# Altium PCB PCB1.PcbDoc
Units mm, origin at the board's own origin, x right, y up, seen from the top; angles counter-clockwise.
Board outline 74.98 x 34 mm, 2 copper layers (Top Layer, Bottom Layer), stack 1.55 mm thick; 69 components, 50 nets, 257 pads, 55 vias.
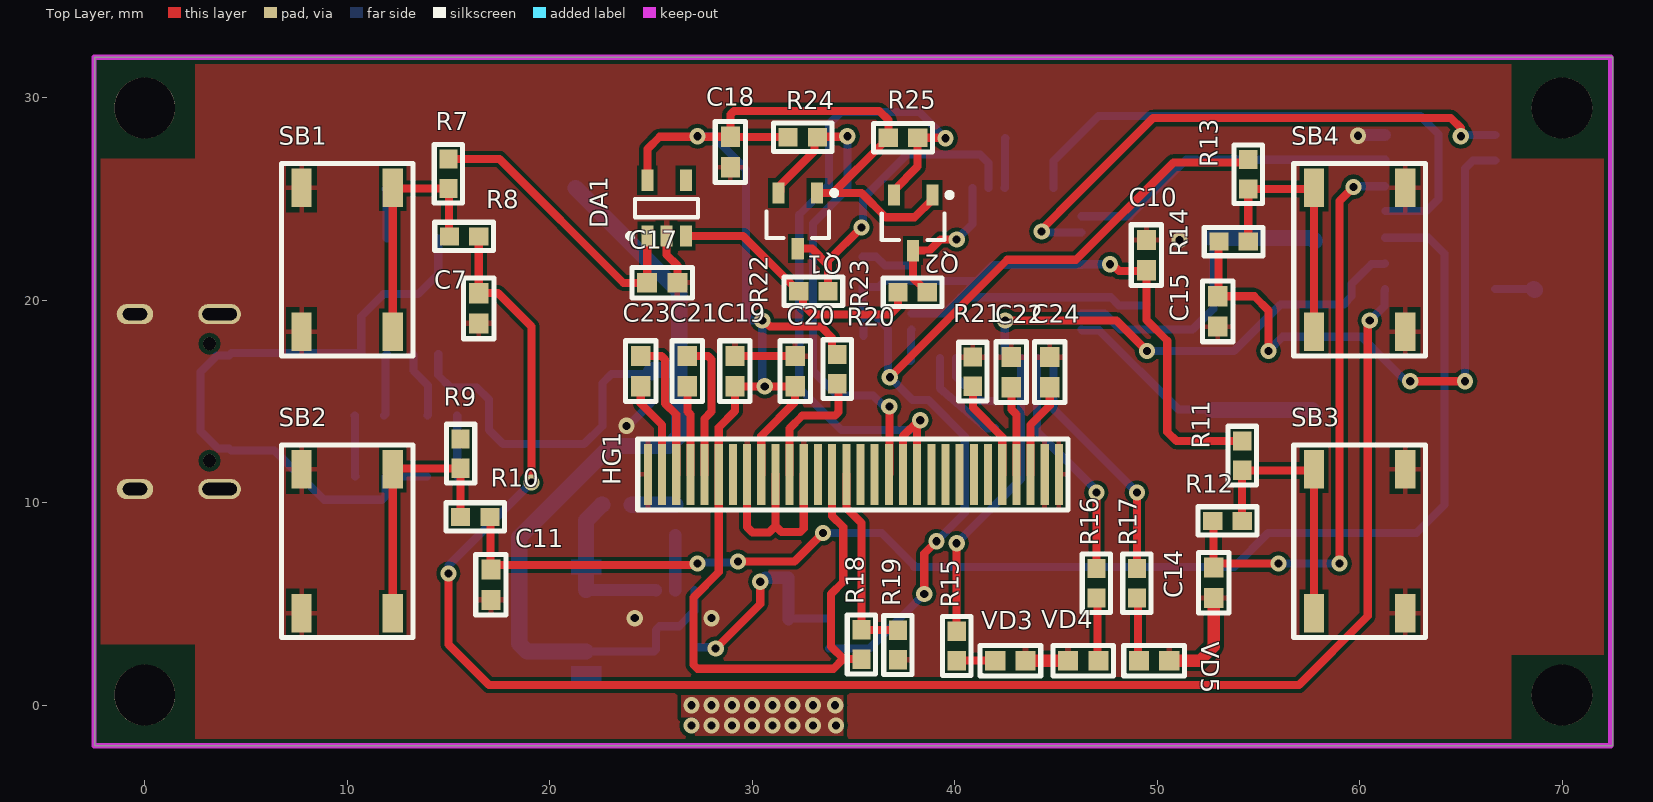
[diagram p0: Top Layer view]
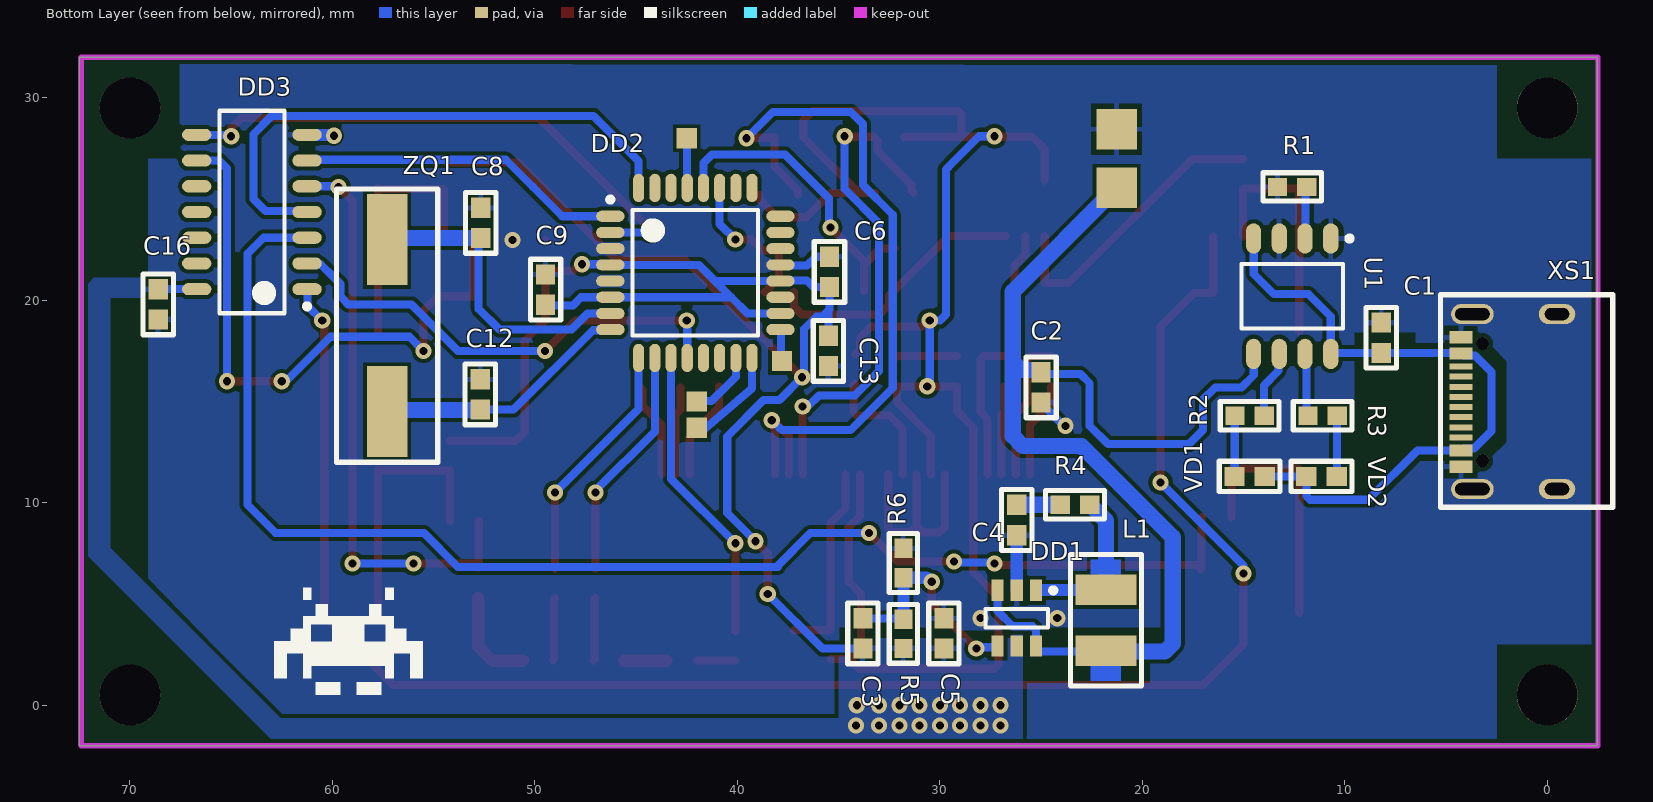
[diagram p1: Bottom Layer view, seen from below]
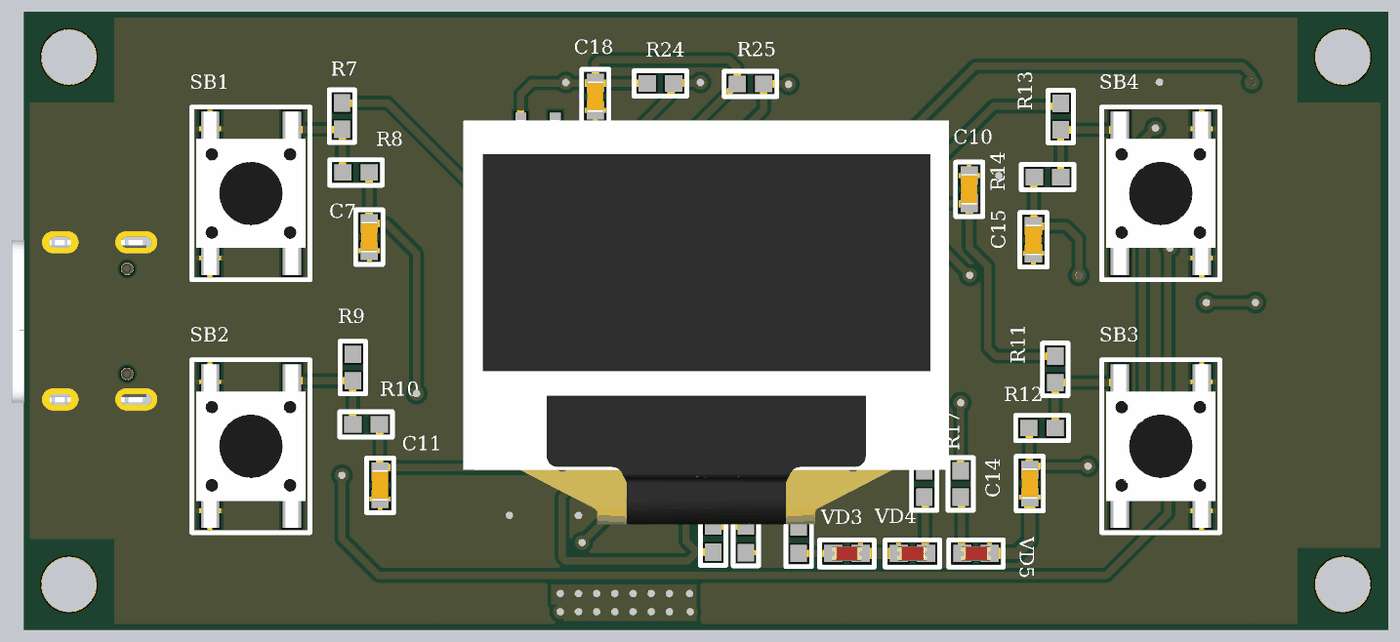
[diagram p2: 3D render of the assembled board from above, using the file's embedded part models]
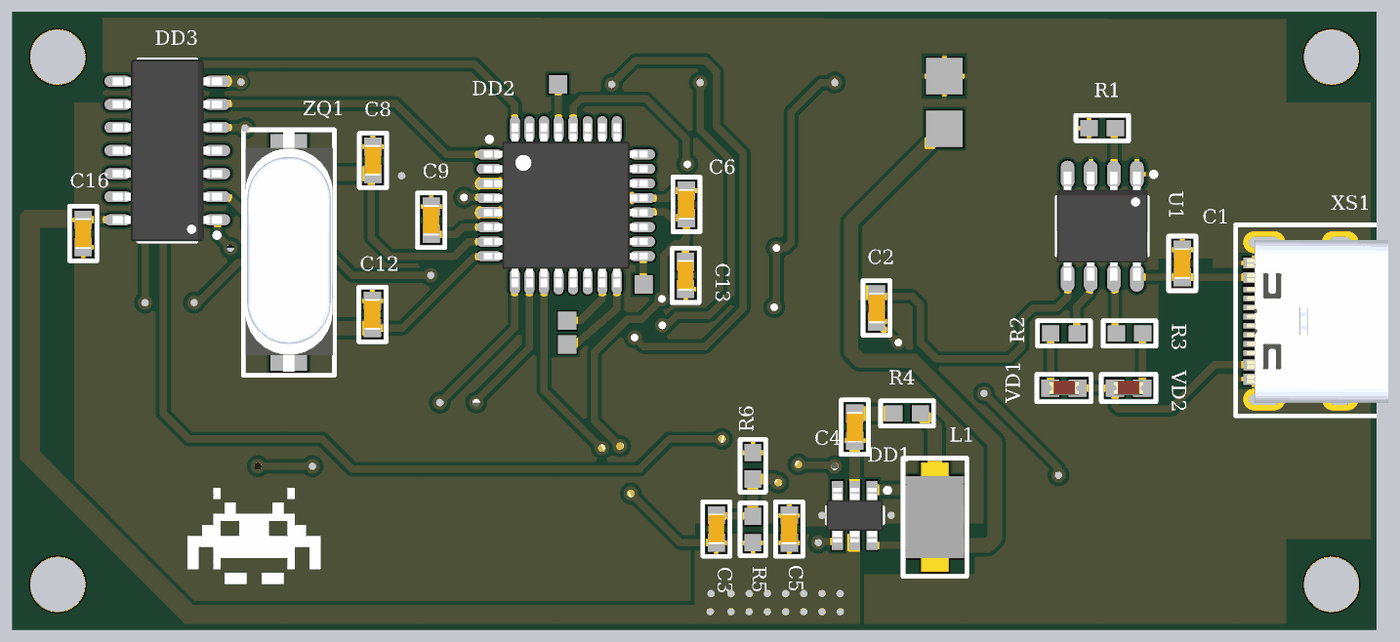
[diagram p3: 3D render of the assembled board from below, using the file's embedded part models]

## Layer stack, top to bottom
Top Solder: solder mask 0.0254, SM-002, Dk 4
Top Layer: signal copper 0.35
Dielectric 1: dielectric 0.85, FR-4, Dk 4.8
Bottom Layer: signal copper 0.35
Bottom Solder: solder mask 0.0254, SM-002, Dk 4

## Board outline
-2.475,-2 72.5,-2 72.5,32 -2.475,32

## Design rules (kind name [scope] priority, off if disabled: settings)
Clearance [All] p1: gap=0.2 ignorepadtopadclearanceinfootprint=FALSE except(0.1: SMDPad-SMDPad SMDPad-THPad THPad-THPad)
PlaneClearance [All] p1: clearance=0.5
PlaneConnect [All] p1: planeconnectstyle=Direct reliefexpansion=0.508 reliefentries=4 reliefconductorwidth=0.254 reliefairgap=0.254
PolygonConnect [All] p1: connectstyle=Direct reliefconductorwidth=0.254 reliefentries=4 polygonreliefangle="90 Angle" airgapwidth=0.254
RoutingVias [All] p1: holewidth=0.6 width=1 viastyle="Through Hole" minholewidth=0.4 minwidth=0.7 maxholewidth=0.711 maxwidth=1.27
SolderMaskExpansion [All] p1: expansion=0.102 istentingtop=FALSE
UnpouredPolygon [All] p1: allowunpoured=TRUE allowshelved=TRUE
Width [All] p1: maxlimit=0.8 minlimit=0.254 preferedwidth=0.4
27 further rules are at their usual default settings.

## Classes and differential pairs
component class ControlBlock: C6 C7 C8 C9 C10 C11 C12 C13 C14 C15 C16 C17 C18 C19 C20 C21 C22 C23 C24 DA1 DD2 DD3 HG1 Q1 Q2 R7 R8 R9 R10 R11 R12 R13 R14 R15 R16 R17 R18 R19 R20 R21 R22 R23 R24 R25 SB1 SB2 SB3 SB4 VD3 VD4 VD5 Z1 ZQ1
component class Sheet1: C1 C2 C3 C4 C5 DD1 L1 R1 R2 R3 R4 R5 R6 U1 VD1 VD2 XS1

## Components (designator, comment, footprint, x,y, rotation, side; value= is the part's Value field where it differs from the comment)
C1 "0.1uF" "Cap 0603" 8.2,18.15 r270 bottom
C2 "10uF" "Cap 0603" 25,15.7 r90 bottom
C3 "3.6pF" "Cap 0603" 33.8,3.55 r270 bottom
C4 "1nF" "Cap 0603" 26.2,9.15 r270 bottom
C5 "10uF" "Cap 0603" 29.8,3.55 r90 bottom
C6 "0.1uF" "Cap 0603" 35.45,21.4 r270 bottom
C7 "0.1uF" "Cap 0603" 16.5,19.6 r90 top locked
C8 "15pF" "Cap 0603" 52.673,23.825 r270 bottom
C9 "0.1uF" "Cap 0603" 49.475,20.527 r270 bottom
C10 "0.1uF" "Cap 0603" 49.475,22.227 r270 top
C11 "0.1uF" "Cap 0603" 17.1,5.95 r90 top locked
C12 "15pF" "Cap 0603" 52.7,15.35 r270 bottom
C13 "0.1uF" "Cap 0603" 35.5,17.5 r90 bottom
C14 "0.1uF" "Cap 0603" 52.8,6.05 r90 top locked
C15 "0.1uF" "Cap 0603" 53,19.45 r90 top locked
C16 "0.1uF" "Cap 0603" 68.6,19.8 r90 bottom
C17 "1uF" "Cap 0603" 25.562,20.863 r180 top
C18 "2.2uF" "Cap 0603" 28.925,27.325 r90 top
C19 "2.2uF" "Cap 0603" 29.15,16.5 r270 top
C20 "2.2uF" "Cap 0603" 32.125,16.5 r270 top
C21 "2.2uF" "Cap 0603" 26.8,16.5 r90 top
C22 "2.2uF" "Cap 0603" 42.8,16.45 r270 top
C23 "2.2uF" "Cap 0603" 24.5,16.5 r270 top
C24 "2.2uF" "Cap 0603" 44.7,16.45 r270 top
DA1 "AP2112K-3.3TRG1" SOT23-5 25.775,24.55 r90 top
DD1 "TPS61070DDCR" SOT23-6 26.2,4.3 r270 bottom (schematic designator DD?)
DD2 "ATMEGA328P" TQFP32 42.075,21.35 r180 bottom locked
DD3 "74AHC14D.112" SOIC14 63.975,24.36 r0 bottom
HG1 "ssd1306-0.96" SSD1306_0.96_I2C 35,11.4 r0 top locked
L1 "LQH43MN4R7K" LQH43M 21.8,4.2 r90 bottom
Q1 "BSS138" SOT23 32.25,23.925 r270 top
Q2 "BSS138" SOT23 37.95,23.825 r270 top
R1 "5k" "Resistor 0603" 12.6,25.6 r180 bottom
R2 "1k" "Resistor 0603" 14.7,14.3 r0 bottom
R3 "1k" "Resistor 0603" 11.1,14.3 r180 bottom
R4 "5.1" "Resistor 0603" 23.325,9.9 r0 bottom
R5 "820k" "Resistor 0603" 31.8,3.525 r90 bottom
R6 "91k" "Resistor 0603" 31.8,7.025 r90 bottom
R7 "10k" "Resistor 0603" 15,26.25 r270 top locked
R8 "100k" "Resistor 0603" 15.775,23.15 r0 top locked
R9 "10k" "Resistor 0603" 15.6,12.425 r270 top locked
R10 "100k" "Resistor 0603" 16.325,9.3 r0 top locked
R11 "10k" "Resistor 0603" 54.2,12.325 r270 top locked
R12 "100k" "Resistor 0603" 53.475,9.1 r180 top locked
R13 "10k" "Resistor 0603" 54.5,26.225 r270 top locked
R14 "100k" "Resistor 0603" 53.775,22.9 r180 top locked
R15 "180" "Resistor 0603" 40.1,2.925 r90 top
R16 "180" "Resistor 0603" 47,6.025 r90 top
R17 "180" "Resistor 0603" 49,6.025 r90 top
R18 "0*" "Resistor 0603" 35.4,3 r90 top
R19 "0*" "Resistor 0603" 37.2,2.975 r270 top
R20 "10k" "Resistor 0603" 34.2,16.6 r90 top
R21 "390" "Resistor 0603" 40.9,16.475 r270 top
R22 "10k" "Resistor 0603" 33.025,20.45 r180 top
R23 "10k" "Resistor 0603" 37.925,20.4 r180 top
R24 "10k" "Resistor 0603" 32.5,28.05 r180 top
R25 "10k" "Resistor 0603" 37.45,28.025 r180 top
SB1 "Button" Button_6x6 10,22 r90 top locked
SB2 "Button" Button_6x6 10,8.1 r90 top locked
SB3 "Button" Button_6x6 60,8.1 r270 top locked
SB4 "Button" Button_6x6 60,22 r270 top locked
U1 "TP4056" SOP8 12.6,20.2 r270 bottom
VD1 "LED 0603" VD0603 14.7,11.3 r0 bottom
VD2 "LED 0603" VD0603 11.15,11.3 r180 bottom
VD3 "LED_3" VD0603 42.75,2.2 r0 top
VD4 "LED_2" VD0603 46.35,2.2 r180 top
VD5 "LED_1" VD0603 49.85,2.2 r0 top
XS1 "USB C" "USB C 16" 1.895,14.996 r90 bottom
ZQ1 "HC-49SM" HC-49SM 57.3,18.75 r270 bottom

## Footprints (in the part's own frame and the unit in brackets; to place one, negate y for a bottom-side part, rotate by r counter-clockwise, add the part's x,y. Pads: shape width x height; smd on the part's side, far side on the other; paste and mask are expansions set on the pad)
Button_6x6 [mm]
  rect 1.9x1 smd paste+0: 1(-3.55,2.25) 1(3.55,2.25) 2(-3.55,-2.25) 2(3.55,-2.25)
  silkscreen extent -4.75,-3.25 4.75,3.25, body extent -4.5,-3 4.5,3, height 4.3
"Cap 0603" [mm]
  rect 1x0.95 smd: 1(-0.75,0) 2(0.75,0)
  silkscreen extent -1.5,-0.75 1.5,0.75, body extent -0.85,-0.45 0.85,0.45, height 0.8
HC-49SM [mm]
  rect 4.5x2 smd paste+0: 1(-4.25,0) 2(4.25,0)
  silkscreen extent -6.75,-2.5 6.75,2.5, body extent -6.65,-2.39 6.55,2.41, height 4.3
LQH43M [mm]
  rect 1.5x3 smd paste+0: 1(-1.5,0) 2(1.5,0)
  Top Layer region: 3,-0.75 2.25,-0.75 2.25,0.75 3,0.75
  Top Layer region: -3,0.75 -2.25,0.75 -2.25,-0.75 -3,-0.75
  silkscreen extent -3.25,-1.75 3.25,1.75, body extent -2.25,-1.6 2.25,1.6, height 2.8
"Resistor 0603" [mm]
  rect 0.95x0.9 smd: 1(-0.725,0) 2(0.725,0)
  silkscreen extent -1.45,-0.7 1.45,0.7, body extent -0.85,-0.45 0.85,0.45, height 0.55
SOIC14 [mm] "SOIC, 14-Leads, Body 9,90x3,90mm, Pitch 1,27mm, IPC Medium Density"
  oval 1.45x0.6 smd: 1(-2.725,3.81) 2(-2.725,2.54) 3(-2.725,1.27) 4(-2.725,0) 5(-2.725,-1.27) 6(-2.725,-2.54) 7(-2.725,-3.81) 8(2.725,-3.81) 9(2.725,-2.54) 10(2.725,-1.27) 11(2.725,0) 12(2.725,1.27) 13(2.725,2.54) 14(2.725,3.81)
  silkscreen extent -2.85,-5 1.6,5, body extent -3,-5 3,5, height 1.75
SOP8 [mm] "TSOP, 8-Leads, Body 4,90x3,90mm, Pitch 1,27mm, IPC Medium Density"
  oval 1.5x0.75 smd: 1(-2.85,1.905) 2(-2.85,0.635) 3(-2.85,-0.635) 4(-2.85,-1.905) 5(2.85,-1.905) 6(2.85,-0.635) 7(2.85,0.635) 8(2.85,1.905)
  silkscreen extent -2.97,-2.5 1.6,2.95, body extent -3,-2.5 3,2.5, height 1.3
SOT23 [mm]
  rect 1.05x0.6 smd: 1(-1.375,0.95) 2(-1.375,-0.95) 3(1.375,0)
  silkscreen extent -1.5,-1.55 0.85,1.93, body extent -1.5,-1.55 1.5,1.55, height 1.3
SOT23-5 [mm]
  rect 1.05x0.6 smd: 1(-1.375,0.95) 2(-1.375,0) 3(-1.375,-0.95) 4(1.375,-0.95) 5(1.375,0.95)
  silkscreen extent -1.5,-1.55 0.45,1.92, body extent -1.5,-1.55 1.5,1.55, height 1.3
SOT23-6 [mm] "SOT23, 6-Leads, Body 3,00x2,85mm, Pitch 0,95mm, IPC Medium Density"
  rect 1.05x0.6 smd: 1(-1.375,0.95) 2(-1.375,0) 3(-1.375,-0.95) 4(1.375,-0.95) 5(1.375,0) 6(1.375,0.95)
  silkscreen extent -1.5,-1.55 0.45,1.92, body extent -1.5,-1.55 1.5,1.55, height 1.3
SSD1306_0.96_I2C [mm]
  rect 0.4x3 smd paste+0: 1(-10.15,0) 2(-9.45,0) 3(-8.75,0) 4(-8.05,0) 5(-7.35,0) 6(-6.65,0) 7(-5.95,0) 8(-5.25,0) 9(-4.55,0) 10(-3.85,0) 11(-3.15,0) 12(-2.45,0) 13(-1.75,0) 14(-1.05,0) 15(-0.35,0) 16(0.35,0) 17(1.05,0) 18(1.75,0) 19(2.45,0) 20(3.15,0) 21(3.85,0) 22(4.55,0) 23(5.25,0) 24(5.95,0) 25(6.65,0) 26(7.35,0) 27(8.05,0) 28(8.75,0) 29(9.45,0) 30(10.15,0)
  silkscreen extent -10.65,-1.75 10.6,1.75, body extent -13.33,-7.62 13.37,14.6, height 3.87
TQFP32 [mm]
  oval 1.4x0.55 smd: 1(-4.2,2.8) 2(-4.2,2) 3(-4.2,1.2) 4(-4.2,0.4) 5(-4.2,-0.4) 6(-4.2,-1.2) 7(-4.2,-2) 8(-4.2,-2.8) 17(4.2,-2.8) 18(4.2,-2) 19(4.2,-1.2) 20(4.2,-0.4) 21(4.2,0.4) 22(4.2,1.2) 23(4.2,2) 24(4.2,2.8)
  oval 0.55x1.4 smd: 9(-2.8,-4.2) 10(-2,-4.2) 11(-1.2,-4.2) 12(-0.4,-4.2) 13(0.4,-4.2) 14(1.2,-4.2) 15(2,-4.2) 16(2.8,-4.2) 25(2.8,4.2) 26(2,4.2) 27(1.2,4.2) 28(0.4,4.2) 29(-0.4,4.2) 30(-1.2,4.2) 31(-2,4.2) 32(-2.8,4.2)
  silkscreen extent -4.33,-3.1 3.1,3.75, body extent -4.5,-4.5 4.5,4.5, height 1.6
"USB C 16" [mm]
  round 0.65 hole 0.65: 0(-2.92,1.305) 0(2.86,1.305)
  rect 0.6x1.14 smd: 1(-3.22,2.375) 2(-2.42,2.375) 11(2.38,2.375) 12(3.18,2.375)
  rect 0.3x1.14 smd: 3(-1.77,2.375) 4(-1.27,2.375) 5(-0.77,2.375) 6(-0.27,2.375) 7(0.23,2.375) 8(0.73,2.375) 9(1.23,2.375) 10(1.73,2.375)
  oval 1x2.1 hole 0.6 slot 1.7 at 90 deg unplated: 13(-4.32,1.805) 14(4.32,1.805)
  oval 1x1.8 hole 0.6 slot 1.2 at 90 deg unplated: 15(-4.32,-2.375) 16(4.32,-2.375)
  silkscreen extent -5.22,-5.12 5.28,3.38, body extent -4.49,-5 4.45,2.75, height 3.26
VD0603 [mm]
  rect 1x0.95 smd: 1(-0.75,0) 2(0.75,0)
  silkscreen extent -1.5,-0.75 1.5,0.75, body extent -0.81,-0.4 0.81,0.4, height 0.6

## Part data
C1 C2 C3 C4 C5 C6 C7 C8 C9 C10 C11 C12 C13 C14 C15 C16 C17 C18 C19 C20 C21 C22 C23 C24: library part Capacitor
DA1: library part Linear_stabilizer_3.3
HG1: library part OLED_0.96
L1: library part Inductor
Q1 Q2: library part "N-Channel MOSFET"
R1 R2 R3 R4 R5 R6 R7 R8 R9 R10 R11 R12 R13 R14 R15 R16 R17 R18 R19 R20 R21 R22 R23 R24 R25: library part Resistor, "SMD 0402-0805"
VD3 VD4 VD5: library part LED
XS1: library part "USB C 16"

## Free pads (board coordinates)
  round 3 hole 3 paste+0 mask+0.102: 2(0,0.5) 2(0,29.5) 2(70,0.5) 2(70,29.5)
  rect 1x1 smd far side paste+0 mask+0.102: 3(42.5,28) 4(42,15) 5(42,13.7) 6(37.8,17)
  rect 2x2 smd far side paste+0 mask+0.102: 7(21.275,25.55) 8(21.275,28.45)

## Via types
v1: diameter 0.8, hole 0.4, Top Layer to Bottom Layer, tented both sides, 55 vias

## Nets (pads, with @x,y where several pads share a name; then routed paths per layer and width w, separated by ;. In a path a pad name is that pad's centre, name@x,y a point inside that pad or via, vN(x,y) a via of type N, cw(c..) or ccw(c..) an arc to the next point about the centre after c; other vN are vias at no path point)
+3.3: C18.2 C19.2 C20.2 DA1.5 HG1.6 HG1.9 HG1.14 Q1.1 Q2.1 R18.1 R20.2 R24.2 R25.2 | length 89.7
  Top Layer w0.4: DA1.5 24.825,27.466 25.434,28.075 C18.2 ; HG1.9 30.45,13.3 32.125,14.975 C20.2 v1(30.625,15.75) C19.2 29.15,14.525 28.35,13.725 HG1.6 28.35,6.574 27.1,5.324 27.1,2 27.3,1.8 32.713,1.8 34.017,1.8 34.492,2.275 ; v1(30.5,19) 30.576,19 30.876,18.7 33.4,18.7 33.95,18.15 33.95,17.575 R20.2 ; R24.2 31.762,28.062 28.938,28.062 C18.2 ; Q1.1 34,25.3 ; HG1.14 33.95,9.35 34.5,8.8 34.5,6.1 33.9,5.5 33.9,2.9 34.525,2.275 R18.1 ; Q2.1 38.9,24.975 38.025,24.1 36.6,24.1 35.4,25.3 34,25.3 ; C18.2 28.925,29.174 29.101,29.35 36.275,29.35 36.725,28.9 R25.2 36.7,28.025 36.45,27.775 36.45,27.75 34,25.3
  Bottom Layer w0.4: v1(27.3,28.1) 28.066,28.1 29.366,26.8 29.7,26.466 29.7,19.3 30,19 v1(30.5,19) 30.5,15.875 v1(30.625,15.75)
+5: C3.2 C5.1 C6.2 C9.2 C10.2 C13.2 C16.2 C17.2 DA1.1 DA1.3 DD1.5 DD2.4 DD2.6 DD2.18 DD2.20 DD3.14 R5.1 R7.1 R9.1 R11.1 R13.1 R22.2 R23.2 | length 118
  Top Layer w0.4: R7.1 17.525,26.975 23.637,20.863 C17.2 24.819,20.869 24.819,23.169 DA1.1 ; DA1.3 29.55,23.175 32.275,20.45 R22.2 32.52,20.23 32.52,19.78 33,19.3 36.8,19.3 37.2,19.7 R23.2 ; v1(36.8,16.2) 42.6,22 46,22 50.8,26.8 54.35,26.8 R13.1 ; v1(38.5,5.5) 38.5,7.5 v1(39.1,8.1) ; v1(47.675,21.777) 47.702,21.75 47.822,21.75 48.122,21.45 C10.2@49.475,21.45 ; C10.2 C10.2@49.475,21.45 ; R11.1 50.95,13.05 50.5,13.5 50.5,18 49.475,19.025 C10.2@49.475,21.45
  Bottom Layer w0.4: C3.2 35.8,2.8 v1(38.5,5.5) ; C13.2 35.5,19.5 ; DD2.18 39.5,19.35 40.3,20.15 ; v1(39.1,8.1) 40.5,9.5 40.5,13.275 38.701,15.074 37.926,15.074 v1(36.8,16.2) 36.7,16.3 36.7,18.591 36.083,19.208 35.792,19.208 35.5,19.5 ; DD2.6@46.122,20.15 47.722,20.15 48.122,19.75 49.448,19.75 C9.2 ; DD2.6 40.3,20.15 ; DD2.4 41.9,21.75 41.1,20.95 ; DD2.4@46.375,21.777 v1(47.675,21.777) ; DD3.14 C16.2 ; 35.5,19.5 35.45,19.55 C6.2 36.25,20.65 36.575,20.975 37.85,20.975 DD2.20 41.1,20.95 ; 40.3,20.15 41.1,20.95
  Bottom Layer w0.8: C16.2 C16.2@68.65,20.5
  other v1: 27,-1 28,-1 29,-1 30,-1 31,-1 32,-1 33,-1 34.143,-1 27,0 28,0 29,0 30,0 31,0 32,0 33,0 34.1,0
+5Charge: C1.2 U1.4 U1.8 VD1.1 VD2.1 XS1.2 XS1.11 | length 33.2
  Bottom Layer w0.4: VD1.1 VD2.1 11.9,10.326 11.724,10.15 8.85,10.15 6.42,12.58 4.275,12.58 4.175,12.68 3.62,12.68 2.759,13.541 2.759,16.459 3.58,17.28 4.175,17.28 4.275,17.38 4.285,17.39 8.19,17.39 C1.2 10.645,17.4 U1.8 10.695,19.195 11.8,20.3 13.5,20.3 14.5,21.3 14.5,23.045 U1.4
Battery_OUT+: C2.2 DD1.3 DD1.6 L1.1 pad.7 U1.5 | length 58.7
  Bottom Layer w0.4: U1.5 14.5,17.345 14.5,16.3 15.1,15.7 16.4,15.7 17,15.1 17,13.6 17.7,12.9 21.7,12.9 22.6,13.8 22.6,15.9 23.05,16.35 C2.2@24.8,16.35 ; L1.1@21.8,2.65 25.15,2.65 DD1.6@25.2,2.7 ; DD1.6@25.25,2.75 25.25,3.724 25.426,3.9 26.4,3.9 27.15,4.65 DD1.3 DD1.3@27.162,5.687
  Bottom Layer w0.8: pad.7 26.4,20.425 26.4,16.969 ; L1.1@21.8,2.65 18.893,2.65 18.5,3.043 18.5,8.3 23,12.8 25.9,12.8 26.4,13.3 26.4,16.969 ; C2.2 25,16.475 25.075,16.55 25.981,16.55 26.4,16.969
Button_1: DD2.12 DD3.2 | length 23.4
  Top Layer w0.4: v1(42.5,19) 48,19 v1(49.5,17.5)
  Bottom Layer w0.4: DD2.12 42.475,18.975 v1(42.5,19) ; v1(49.5,17.5) 53.8,17.5 56.1,19.8 59.224,19.8 59.4,19.976 59.4,20 59.6,20.2 59.6,20.8 59.9,21.1 60.582,21.782 61.212,21.782 DD3.2
Button_2: DD2.32 DD3.4 | length 27.7
  Bottom Layer w0.4: DD2.32 44.875,26.875 47.1,29.1 63,29.1 63.9,28.2 63.9,25 63.3,24.4 DD3.4@61.275,24.4
Button_3: DD2.1 DD3.6 | length 16.2
  Bottom Layer w0.4: DD2.1 48.65,24.15 50.107,25.607 51.44,26.94 DD3.6@61.275,26.94
Button_4: DD2.2 DD3.8 | length 27.3
  Top Layer w0.4: v1(44.3,23.4) 44.3,23.5 46,25.2 49.8,29 64.5,29 65,28.5 v1@65,28.2
  Bottom Layer w0.4: v1(44.3,23.4) 44.35,23.35 DD2.2 ; v1@64.975,28.16 64.985,28.17 DD3.8
  other v1: 65,28.1
GND: C1.1 C2.1 C4.2 C5.2 C6.1 C7.1 C8.1 C9.1 C10.1 C11.1 C12.1 C13.1 C14.1 C15.1 C16.1 C17.1 C18.1 C19.1 C20.1 C22.1 C24.1 DA1.2 DD1.2 DD2.3 DD2.5 DD2.21 DD3.7 HG1.1 HG1.8 HG1.10 HG1.12 HG1.29 HG1.30 pad.8 R1.1 R6.2 R19.2 R21.1 SB1.1 SB2.1 SB3.1 SB4.1 U1.1 U1.3 VD3.2 VD4.2 VD5.2 XS1.1 XS1.12 XS1.13 XS1.14 XS1.15 XS1.16 | length 32.1
  Top Layer w0.4: DA1.2 25.775,22.25 26.312,21.713 C17.1 ; C19.1 C20.1 C20.1@32.213,17.162 ; HG1.8 29.75,8.8 30.025,8.525 30.825,8.525 31.15,8.85 ; HG1.10 31.15,8.85 ; HG1.12 32.55,8.726 32.374,8.55 31.45,8.55 31.15,8.85 ; C10.1@49.448,22.95 C10.1
  Top Layer w0.6: VD3.2 VD4.2 ; VD5.2 52.1,2.2 52.8,2.9 C14.1
  Bottom Layer w0.4: v1(23.8,13.8) 23.875,13.8 25,14.925 C2.1 ; C6.1 36.125,22.15 36.554,21.721 37.846,21.721 DD2.21
  Bottom Layer w0.6: DD1.2 C4.2 ; v1(59.925,28.125) 59.985,28.125 60.03,28.17 DD3.7
  other v1: 24.2,4.3 28,4.3 51.1,22.975
I2C_ADR: HG1.15 R18.2 R19.1 | length 9.8
  Top Layer w0.4: HG1.15 34.65,9.75 35.4,9 R18.2 35.412,3.712 37.187,3.712 R19.1
MISO: DD2.16 pad.5 | length 5
  Bottom Layer w0.4: DD2.16 39.275,15.655 41.584,13.669 41.708,13.678 pad.5
MOSI: DD2.15 pad.4 | length 3.4
  Bottom Layer w0.4: DD2.15 40.075,16.225 40.5,15.8 41.276,15.024 41.976,15.024 pad.4
NetC3_1: C3.1 DD1.4 R5.2 R6.1 | length 10.9
  Top Layer w0.4: v1(28.2,2.8) 30.4,5 v1(30.4,6.1)
  Bottom Layer w0.4: DD1.4 27.212,2.863 28.137,2.863 v1(28.2,2.8) ; R5.2 31.825,4.275 33.775,4.275 C3.1
  Bottom Layer w0.6: v1(30.4,6.1) 30.454,6.1 30.654,6.3 R6.1 R5.2
NetC4_1: C4.1 R4.2 | length 2.1
  Bottom Layer w0.8: R4.2 C4.1
NetC7_2: C7.2 DD3.1 R8.2 | length 87.6
  Top Layer w0.4: v1(15,6.5) 15,3 17,1 57,1 60.4,4.4 60.4,18.9 v1(60.5,19) ; R8.2 C7.2 17.45,20.35 19.1,18.7 v1(19.1,11)
  Bottom Layer w0.4: v1(15,6.5) 15,6.9 v1(19.1,11) ; v1(60.5,19) 61.226,19.726 61.226,20.458 61.25,20.482 DD3.1
NetC8_2: C8.2 DD2.7 ZQ1.1 | length 16
  Bottom Layer w0.4: DD2.7 47.4,19.35 48.2,18.55 51.75,18.55 52.775,19.575 52.775,22.973 C8.2
  Bottom Layer w0.8: C8.2 52.678,23.08 57.645,23.08 ZQ1.1@57.8,22.925
NetC11_2: C11.2 DD3.3 R10.2 | length 67.9
  Top Layer w0.4: R10.2 17.075,9.275 C11.2@17.075,6.725 ; C11.2 C11.2@17.075,6.725 ; v1(27.3,7) 27.223,6.923 17.273,6.923 C11.2@17.075,6.725 ; v1@29.6,7.1 32.1,7.1 v1(33.5,8.5)
  Bottom Layer w0.4: v1(27.3,7) 27.35,7.05 29.25,7.05 v1(29.3,7.1) ; v1(33.5,8.5) 36.4,8.5 38,6.9 38,6.834 53.809,6.834 55.475,8.5 62.8,8.5 64.2,9.9 64.2,22.3 63.41,23.09 DD3.3
NetC12_2: C12.2 DD2.8 ZQ1.2 | length 13.3
  Bottom Layer w0.4: DD2.8 46.304,18.521 47.129,18.521 51.05,14.6 C12.2 52.72,14.58 C12.2@52.776,14.524
  Bottom Layer w0.8: C12.2@52.72,14.58 57.645,14.58 ZQ1.2@57.8,14.425
NetC14_2: C14.2 DD3.5 R12.2 | length 29.1
  Top Layer w0.4: R12.2 52.775,9.075 52.775,6.825 C14.2 53,7 v1(56,7) ; v1(59,7) 59,24.9 v1(59.7,25.6)
  Bottom Layer w0.4: v1(56,7) v1(59,7) ; v1(59.7,25.6) 59.73,25.63 DD3.5
NetC15_2: C15.2 DD3.9 R14.2 | length 30.6
  Top Layer w0.4: R14.2 53.025,22.875 53.025,20.225 C15.2 54.8,20.2 55.5,19.5 v1(55.5,17.5) ; v1(62.5,16) v1(65.2,16)
  Bottom Layer w0.4: v1(55.5,17.5) 56.2,18.2 60.1,18.2 62.3,16 v1(62.5,16) ; v1(65.2,16) 65.2,26.5 65.6,26.9 DD3.9
NetC21_1: C21.1 HG1.4 | length 4.4
  Top Layer w0.4: C21.1 26.8,14.5 26.95,14.35 HG1.4
NetC21_2: C21.2 HG1.5 | length 7.1
  Top Layer w0.4: C21.2 27.824,17.25 28,17.074 28,14.5 27.65,14.15 HG1.5
NetC22_2: C22.2 HG1.27 | length 4.4
  Top Layer w0.4: C22.2 42.8,14.6 43.05,14.35 HG1.27
NetC23_1: C23.1 HG1.3 | length 7.2
  Top Layer w0.4: C23.1 25.524,17.25 25.7,17.074 25.7,14.9 26.25,14.35 HG1.3
NetC23_2: C23.2 HG1.2 | length 4.8
  Top Layer w0.4: C23.2 24.5,14.9 25.55,13.85 HG1.2
NetC24_2: C24.2 HG1.28 | length 4.7
  Top Layer w0.4: HG1.28 43.75,13.85 44.7,14.8 44.7,15.6 C24.2@44.8,15.7
NetDD2_9: DD2.9 R17.2 | length 12.1
  Top Layer w0.4: R17.2 v1(49,10.5)
  Bottom Layer w0.4: DD2.9 44.875,14.625 v1(49,10.5)
NetDD2_10: DD2.10 R16.2 | length 11.6
  Top Layer w0.4: R16.2 v1(47,10.5)
  Bottom Layer w0.4: DD2.10 44.075,13.525 47,10.6 v1(47,10.5)
NetDD2_11: DD2.11 R15.2 | length 14.8
  Top Layer w0.4: R15.2 v1(40.1,8)
  Bottom Layer w0.4: v1(40.1,8) 43.275,11.175 DD2.11
NetDD?_1: DD1.1 L1.2 R4.1 | length 8
  Bottom Layer w0.6: L1.2 25.25,5.7 DD1.1
  Bottom Layer w0.8: L1.2 21.8,6.825 21.8,9.125 22.575,9.9 R4.1
NetHG1_11: HG1.11 R20.1 | length 6.4
  Top Layer w0.4: HG1.11 31.85,13.675 32.475,14.3 34.091,14.3 34.266,14.476 34.266,15.809 R20.1
NetHG1_26: HG1.26 R21.2 | length 5
  Top Layer w0.4: R21.2 40.9,14.7 42.35,13.25 HG1.26
NetR1_2: R1.2 U1.2 | length 2.5
  Bottom Layer w0.4: R1.2@11.9,25.5 11.933,25.468 11.933,23.083 U1.2
NetR2_1: R2.1 U1.6 | length 3.4
  Bottom Layer w0.4: U1.6 13.278,17.307 13.278,16.522 14,15.8 14,14.325 R2.1
NetR2_2: R2.2 VD1.2 | length 3
  Bottom Layer w0.4: R2.2 15.438,14.288 15.438,11.312 VD1.2
NetR3_1: R3.1 U1.7 | length 3.1
  Bottom Layer w0.4: R3.1 11.898,14.373 11.898,17.283 U1.7
NetR3_2: R3.2 VD2.2 | length 3
  Bottom Layer w0.4: R3.2 10.388,14.288 10.388,11.312 VD2.2
NetR7_2: R7.2 R8.1 SB1.2 | length 12.3
  Top Layer w0.4: SB1.2@12.25,18.45 12.25,25.55 12.275,25.525 R7.2 15.025,25.5 15.025,23.175 R8.1@15,23.15
NetR9_2: R9.2 R10.1 SB2.2 | length 12.9
  Top Layer w0.4: SB2.2@12.25,4.55 12.25,11.65 12.3,11.7 R9.2 R10.1
NetR11_2: R11.2 R12.1 SB3.2 | length 13.2
  Top Layer w0.4: R12.1 R11.2 57.7,11.6 57.75,11.65 SB3.2@57.75,4.55
NetR13_2: R13.2 R14.1 SB4.2 | length 13
  Top Layer w0.4: R14.1 R13.2 57.7,25.5 57.75,25.55 SB4.2@57.75,18.45
NetR15_1: R15.1 VD3.1 | length 1.9
  Top Layer w0.4: R15.1 VD3.1
NetR16_1: R16.1 VD4.1 | length 3.1
  Top Layer w0.4: R16.1 47.05,5.25 47.05,2.25 VD4.1
NetR17_1: R17.1 VD5.1 | length 3.1
  Top Layer w0.4: R17.1 49.05,5.25 49.05,2.25 VD5.1
RST: DD2.29 pad.3 | length 2.5
  Bottom Layer w0.4: DD2.29 42.487,25.562 42.487,27.987 pad.3
SCL: DD2.28 Q1.3 R22.1 | length 15.6
  Top Layer w0.4: Q1.3 32.95,22.55 33.75,21.75 ; R22.1 33.75,21.75 ; v1(35.4,23.6) 33.75,21.95 33.75,21.75
  Bottom Layer w0.4: v1(35.4,23.6) 35.475,23.675 35.475,25.025 37.65,27.2 41.25,27.2 41.675,26.775 DD2.28
SCL_3.3: HG1.18 Q1.2 R24.1 | length 25.2
  Top Layer w0.4: Q1.2 31.4,25.4 31.4,25.7 33.076,27.376 33.076,27.901 R24.1 33.25,28.075 34.675,28.075 v1(34.7,28.1) ; HG1.18 36.775,11.425 v1(36.775,14.75)
  Bottom Layer w0.4: v1(34.7,28.1) 34.7,25.5 33,23.8 33,16.5 34.2,15.3 35.975,15.3 36.525,14.75 v1(36.775,14.75)
SDA: DD2.27 Q2.3 R23.1 | length 7.6
  Top Layer w0.4: R23.1 38.625,20.4 38.375,20.65 38.375,20.675 37.95,21.1 Q2.3 38.75,22.45 39.3,23 v1(40.1,23)
  Bottom Layer w0.4: v1(40.1,23) 40.875,23.775 DD2.27
SDA_3.3: HG1.19 HG1.20 Q2.2 R25.1 | length 37.6
  Top Layer w0.4: Q2.2 37,25.425 38.175,26.6 R25.1 39.525,28.025 v1(39.55,28) ; HG1.19 37.45,13.2 ; 37.45,13.3 38.225,14.075 v1(38.3,14.075) 38.3,13.967 38.15,13.817 HG1.20
  Bottom Layer w0.4: v1(38.3,14.075) 37.907,13.682 37.809,13.584 34.416,13.584 32.325,15.675 32.325,24.225 33.8,25.7 33.8,28.7 34.4,29.3 38.25,29.3 v1(39.55,28)
SPI_SCK: DD2.17 pad.6 | length 1.6
  Bottom Layer w0.4: pad.6 37.837,17.037 37.837,18.513 DD2.17
pads on no net: DA1.4 DD2.13 DD2.14 DD2.19 DD2.22 DD2.23 DD2.24 DD2.25 DD2.26 DD2.30 DD2.31 DD3.10 DD3.11 DD3.12 DD3.13 HG1.7 HG1.13 HG1.16 HG1.17 HG1.21 HG1.22 HG1.23 HG1.24 HG1.25 XS1.0 XS1.3 XS1.4 XS1.5 XS1.6 XS1.7 XS1.8 XS1.9 XS1.10

## Polygon pours and split planes (outlines as drawn)
+5 on Bottom Layer "+5_L02_P002" (solid, pour order 2): 25.9,3.5 25.9,-1.5 35,-1.5 35,3.3 26.5,3.3 26.5,3.5
GND on Bottom Layer "GND_L02_P013" (solid, pour order 13): 67.55,31.7 9.525,31.6 9.525,9.5 10.5,9.5 14.5,5.5 17.738,5.5 17.738,3.85 34.969,3.85 34.969,-0.413 62.388,-0.413 62.475,-0.5 69.1,6.264 69.1,27 67.55,27
GND on Bottom Layer "GND_L02_P003" (solid, pour order 3): 25.9,5.2 25.9,3.7 30.7,3.7 30.7,5.2
+5 on Bottom Layer "+5_L02_P015" (solid, pour order 15): 34.999,-0.635 34.822,-1.7 63,-1.7 72.2,7.5 72.2,20.688 71.776,21.112 68.148,21.112 68.148,20.066 68.174,20.041 68.25,20.117 70.968,20.117 70.968,7.823 70.993,7.798 62.56,-0.635
+5 on Bottom Layer "+5_L02_P005" (solid, pour order 5): 25.908,-1.8 35,-1.8 35,0.5 25.908,0.5
GND on Bottom Layer "GND_L02_P006" (solid, pour order 6): -2.2,3 2.5,3 2.5,-1.7 25.875,-1.7 25.875,1.075 19.6,1.075 19.6,5.7 14.3,5.7 10.25,9.75 8.575,9.75 6.275,12.05 2.95,12.05 2,13 2,17 2.9,17.9 6.5,17.9 6.5,18.425 9.725,18.425 9.725,31.6 2.5,31.6 2.5,27 -2.2,27
GND on Top Layer "GND_L01_P012" (solid, pour order 12): -2.5,3 2.5,3 2.5,-2 67.5,-2 67.5,2.5 72.5,2.5 72.5,27 67.5,27 67.5,32 2.5,32 2.5,27 -2.5,27
+5 on Top Layer "+5_L01_P011" (solid, pour order 11): 26.5,0.5 34.5,0.5 34.5,-1.5 26.5,-1.5

## Keep-outs
Keep-Out Layer:
  lines w0.254: -2.5,-2 -2.5,32 72.4,32 72.4,-2 -2.5,-2

## Silkscreen, mask and mechanical layers (free items; w line width, h text height)
Bottom Overlay:
  region: 58.801,0.931 58.801,0.728 58.801,0.525 57.582,0.525 57.582,0.728 57.582,0.931 57.582,1.135 58.801,1.135
  region: 60.833,0.931 60.833,0.728 60.833,0.525 59.614,0.525 59.614,0.728 59.614,0.931 59.614,1.135 60.833,1.135
  region: 57.379,5.605 57.379,5.402 57.379,5.199 56.972,5.199 56.972,5.402 56.972,5.605 56.972,5.808 57.379,5.808
  region: 61.443,5.605 61.443,5.402 61.443,5.199 61.036,5.199 61.036,5.402 61.036,5.605 61.036,5.808 61.443,5.808
  region: 60.833,4.792 60.833,4.589 60.833,4.386 61.443,4.386 61.443,4.183 61.443,3.979 61.443,3.776 62.052,3.776 62.052,3.573 62.052,3.37 62.052,3.167 62.865,3.167 62.865,2.963 62.865,2.76 62.865,2.557 62.865,2.354 62.865,2.151 62.865,1.947 62.865,1.744 62.865,1.541 62.865,1.338 62.256,1.338 62.256,1.541 62.256,1.744 62.256,1.947 62.256,2.151 62.256,2.354 62.256,2.557 61.443,2.557 61.443,2.354 61.443,2.151 61.443,1.947 61.443,1.744 61.443,1.541 61.443,1.338 61.036,1.338 61.036,1.541 61.036,1.744 61.036,1.947 57.379,1.947 57.379,1.744 57.379,1.541 57.379,1.338 56.972,1.338 56.972,1.541 56.972,1.744 56.972,1.947 56.972,2.151 56.972,2.354 56.972,2.557 56.16,2.557 56.16,2.354 56.16,2.151 56.16,1.947 56.16,1.744 56.16,1.541 56.16,1.338 55.55,1.338 55.55,1.541 55.55,1.744 55.55,1.947 55.55,2.151 55.55,2.354 55.55,2.557 55.55,2.76 55.55,2.963 55.55,3.167 56.363,3.167 56.363,3.37 56.363,3.573 56.363,3.776 56.972,3.776 56.972,3.979 56.972,4.183 56.972,4.386 57.582,4.386 57.582,4.589 57.582,4.792 57.582,4.995 58.192,4.995 58.192,4.792 58.192,4.589 58.192,4.386 60.224,4.386 60.224,4.589 60.224,4.792 60.224,4.995 60.833,4.995 hole: 61.036,3.979 60.02,3.979 60.02,3.776 60.02,3.573 60.02,3.37 60.02,3.167 61.036,3.167 61.036,3.37 61.036,3.573 61.036,3.776 hole: 58.395,3.979 57.379,3.979 57.379,3.776 57.379,3.573 57.379,3.37 57.379,3.167 58.395,3.167 58.395,3.37 58.395,3.573 58.395,3.776